# Altium PCB PCB1.PcbDoc
Units mm, origin at the board's own origin, x right, y up, seen from the top; angles counter-clockwise.
Board outline 80.26 x 80.5 mm, 2 copper layers (Top, Bottom); 35 components, 37 nets, 161 pads, 48 vias.
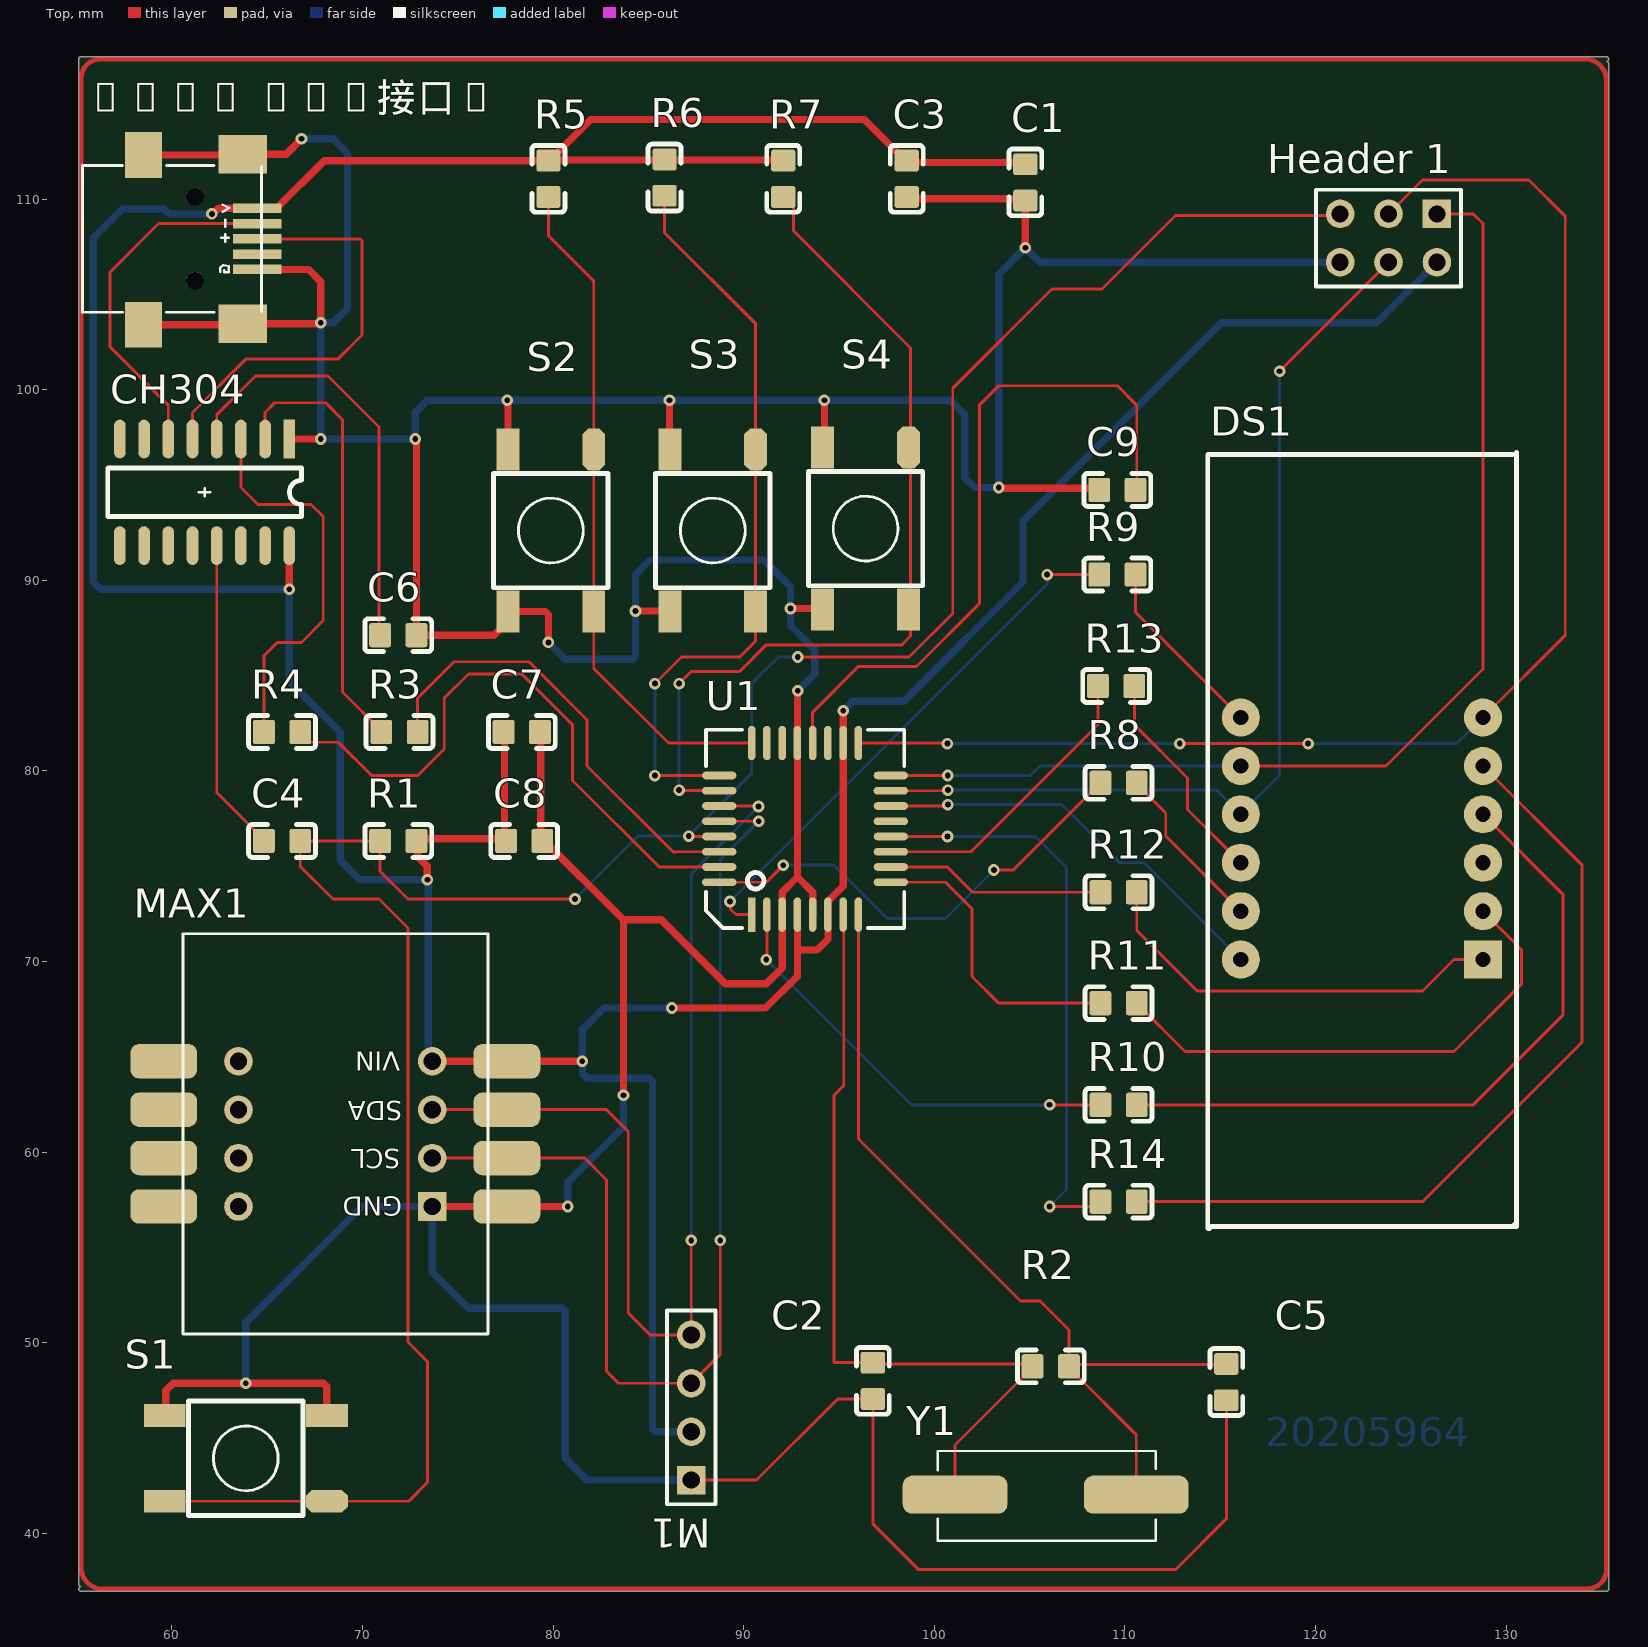
[diagram p0: Top view]
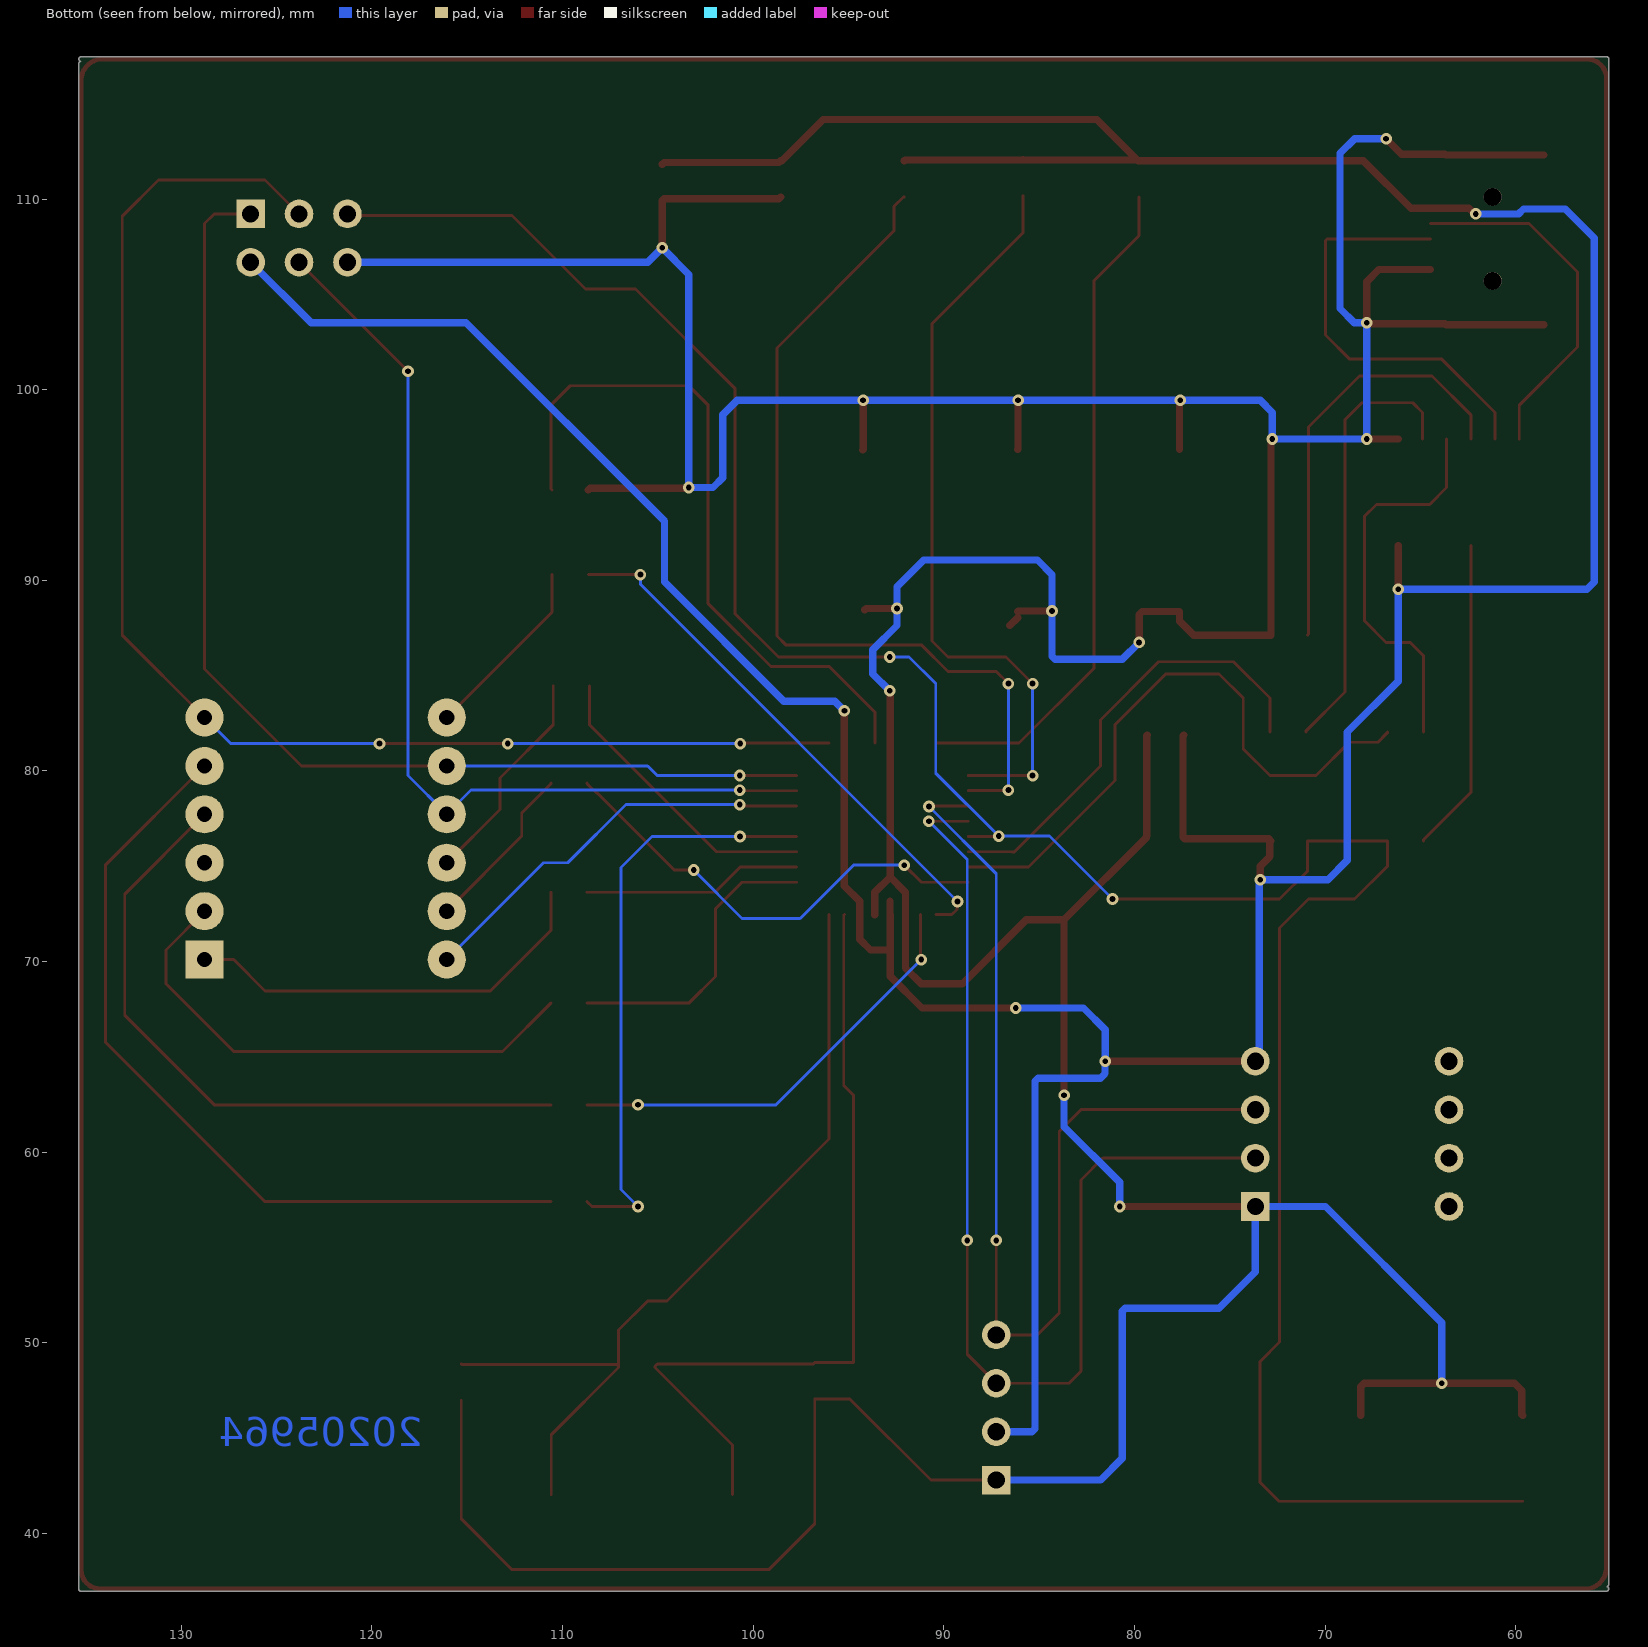
[diagram p1: Bottom view, seen from below]
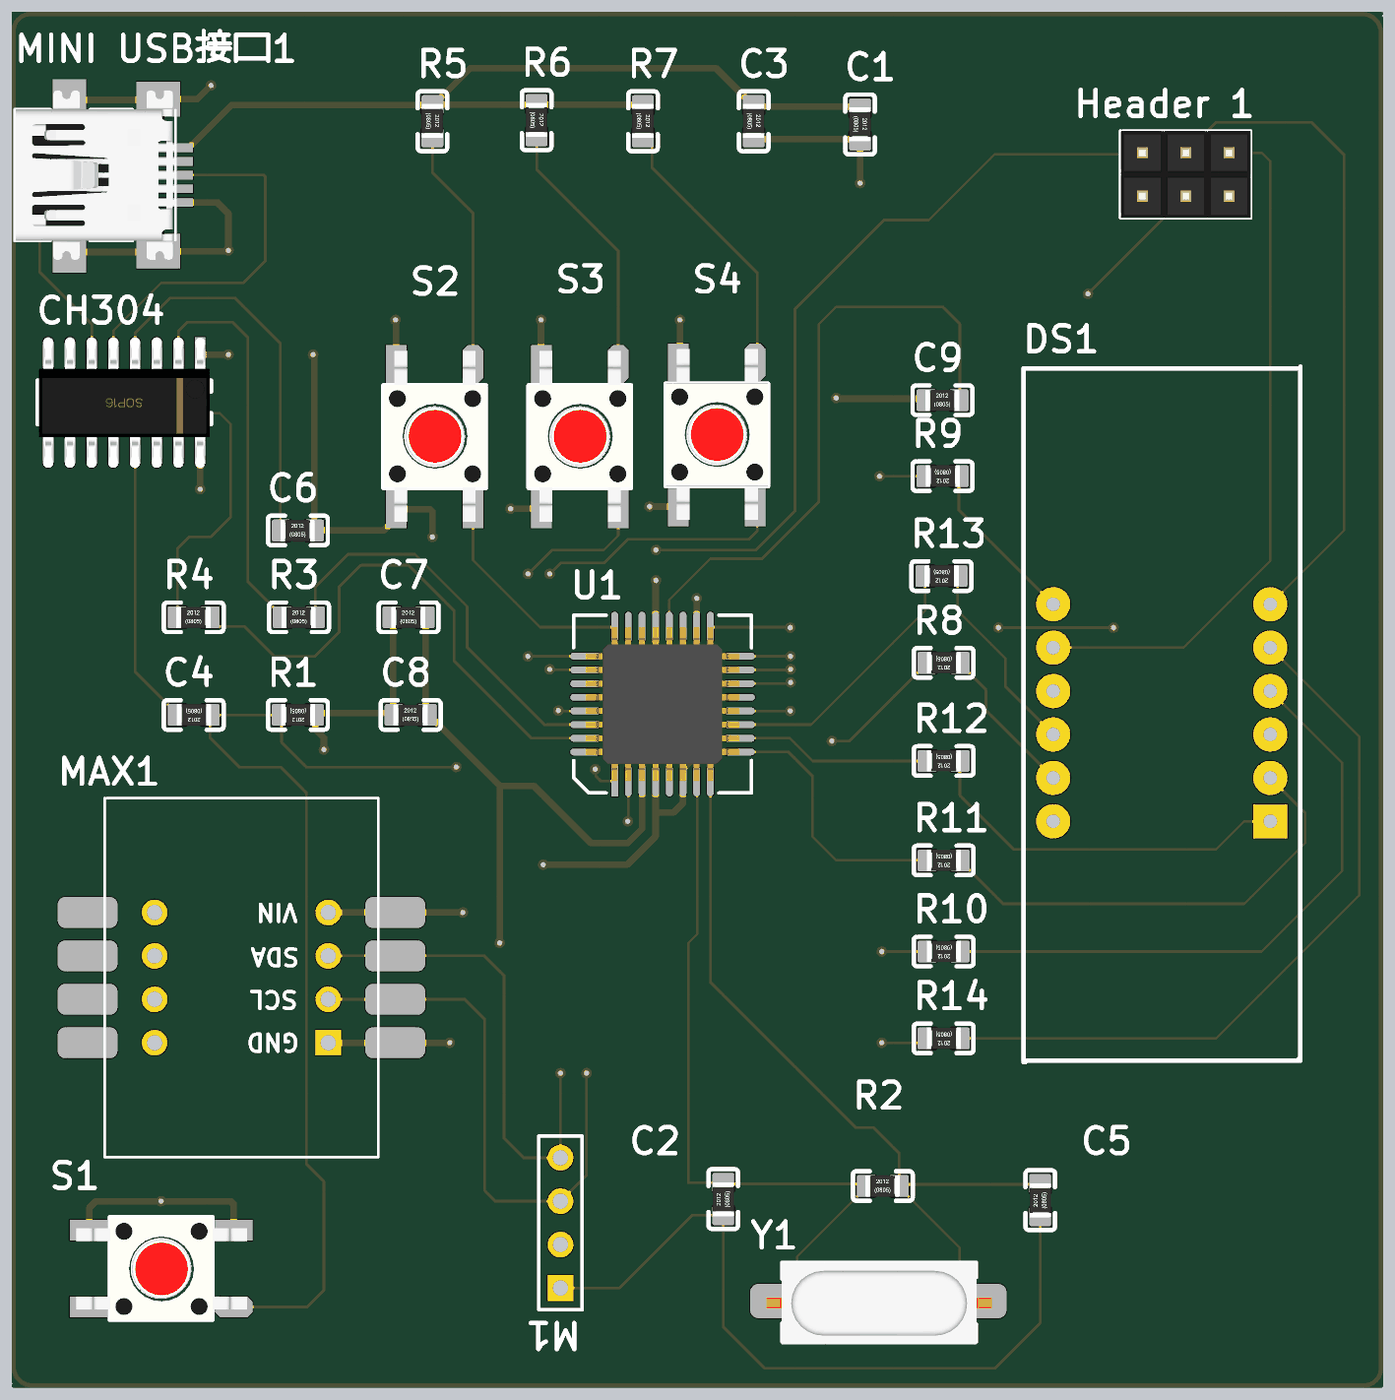
[diagram p2: 3D render of the assembled board from above, using the file's embedded part models]

## Layer stack, top to bottom
Top Solder: solder mask 0.0102, Solder Resist, Dk 3.5
Top: signal copper 0.0356
Dielectric 1: dielectric 0.32, FR-4, Dk 4.8
Bottom: signal copper 0.0356
Bottom Solder: solder mask 0.0102, Solder Resist, Dk 3.5

## Board outline
55.118,37.338 ccw(c55.245,37.338) 55.214,37.215 ccw(c55.255,37.094) 55.255,36.967 135.255,36.967 ccw(c135.255,37.094) 135.382,37.094 135.382,117.094 ccw(c135.255,117.094) 135.286,117.217 ccw(c135.245,117.338) 135.372,117.338 ccw(c135.245,117.338) 135.245,117.465 55.245,117.465 ccw(c55.245,117.338) 55.118,117.338

## Design rules (kind name [scope] priority, off if disabled: settings)
Clearance [All] p1: gap=0.152 ignorepadtopadclearanceinfootprint=FALSE
PolygonConnect [All] p1: thpad.connectstyle=Relief thpad.reliefconductorwidth=0.508 thpad.reliefentries=4 thpad.polygonreliefangle="90 Angle" thpad.airgapwidth=0.254 smdpad.connectstyle=Relief smdpad.reliefconductorwidth=0.508 smdpad.reliefentries=4 smdpad.polygonreliefangle="90 Angle" smdpad.airgapwidth=0.254 via.connectstyle=Direct via.reliefconductorwidth=0.254 via.reliefentries=4 via.polygonreliefangle="90 Angle" via.airgapwidth=0.254
RoutingVias [All] p1: holewidth=0.305 width=0.61 viastyle="Through Hole" minholewidth=0.305 minwidth=0.61 maxholewidth=0.305 maxwidth=0.61
SilkToSilkClearance [All] p1: silktosilkclearance=0.051
SilkToSolderMaskClearance [IsPad] p1: minsilkscreentomaskgap=0.051 clearancetoexposedcopper=TRUE
SolderMaskExpansion [All] p1: expansion=0.064 istentingtop=FALSE
Width Width_1 [InNetClass('PWR')] p1: maxlimit=0.508 minlimit=0.254 preferedwidth=0.381
Width [All] p2: maxlimit=0.152 minlimit=0.152 preferedwidth=0.152
28 further rules are at their usual default settings.

## Components (designator, comment, footprint, x,y, rotation, side; value= is the part's Value field where it differs from the comment)
C1 "10uF" R0805 104.775,110.871 r270 top
C2 "22pF" R0805 96.774,48.006 r90 top
C3 "0.1uF" R0805 98.552,111.061 r270 top
C4 "0.1uF" R0805 65.786,76.327 r180 top
C5 "22pF" R0805 115.316,47.942 r90 top
C6 "0.1uF" R0805 71.882,87.122 r0 top
C7 "0.1uF" R0805 78.359,82.042 r0 top
C8 "10uF" R0805 78.486,76.327 r0 top
C9 "0.1uF" R0805 109.601,94.742 r0 top
CH304 "U2" SO-16 61.722,94.615 r270 top
DS1 "4位共阴数码管" 四位数码管 122.478,76.434 r90 top
"Header 1" "P1" HDR2X3 126.365,109.22 r180 top
M1 "OLED屏" HDR1X4 87.249,42.799 r90 top
MAX1 "血氧传感器" 血氧模块 68.58,60.96 r90 top
"MINI USB接口1" "P2" USB-MINI3 64.476,107.909 r270 top
R1 "Res2" R0805 71.882,76.327 r180 top value=10K
R2 "Res2" R0805 106.108,48.768 r0 top value=1M
R3 "Res2" R0805 71.945,82.042 r0 top value=1K
R4 "Res2" R0805 65.786,82.042 r0 top value=1K
R5 "Res2" R0805 79.756,111.061 r270 top value=10K
R6 "Res2" R0805 85.852,111.125 r270 top value=10K
R7 "Res2" R0805 92.075,111.061 r270 top value=10K
R8 "Res2" R0805 109.664,79.375 r180 top value=1K
R9 "Res2" R0805 109.601,90.297 r180 top value=1K
R10 "Res2" R0805 109.664,62.484 r180 top value=1K
R11 "Res2" R0805 109.664,67.818 r180 top value=1K
R12 "Res2" R0805 109.664,73.635 r180 top value=1K
R13 "Res2" R0805 109.537,84.455 r180 top value=1K
R14 "Res2" R0805 109.664,57.404 r180 top value=1K
S1 "SW-PB" 按钮/SO 63.881,43.942 r0 top
S2 "SW-PB" 按钮/SO 79.883,92.608 r90 top
S3 "SW-PB" 按钮/SO 88.379,92.608 r90 top
S4 "SW-PB" 按钮/SO 96.393,92.71 r90 top
U1 "Atmega328P-AU" LQFP32 93.218,76.962 r90 top
Y1 "16MHz" 49SMD 110.592,42.037 r180 top

## Footprints (in the part's own frame and the unit in brackets; to place one, negate y for a bottom-side part, rotate by r counter-clockwise, add the part's x,y. Pads: shape width x height; smd on the part's side, far side on the other; paste and mask are expansions set on the pad)
49SMD [mm]
  rrect50% 5.5x2 smd: 1(0,0) 2(9.5,0)
  silkscreen extent -1.02,-2.29 10.41,2.41, body extent -1.9,-2.27 11.3,2.53, height 4.3
HDR1X4 [mm] "Connector; Header; 4 Position"
  rect 1.5x1.5 hole 0.9: 1(0,0)
  round 1.5 hole 0.9: 2(2.54,0) 3(5.08,0) 4(7.62,0)
  silkscreen extent -1.27,-1.27 8.89,1.27
HDR2X3 [mm] "Connector; Header; 3x2 Position"
  rect 1.5x1.5 hole 0.9: 1(0,0)
  round 1.5 hole 0.9: 2(0,2.54) 3(2.54,0) 4(2.54,2.54) 5(5.08,0) 6(5.08,2.54)
  silkscreen extent -1.27,-1.27 6.35,3.81, body extent -1.28,-1.27 6.34,3.81, height 8.7
LQFP32 [mm] "RS_R5F212G4"
  rect 1.8x0.4 smd: 1(-4.5,2.8)
  oval 1.8x0.4 smd: 2(-4.5,2) 3(-4.5,1.2) 4(-4.5,0.4) 5(-4.5,-0.4) 6(-4.5,-1.2) 7(-4.5,-2) 8(-4.5,-2.8) 17(4.5,-2.8) 18(4.5,-2) 19(4.5,-1.2) 20(4.5,-0.4) 21(4.5,0.4) 22(4.5,1.2) 23(4.5,2) 24(4.5,2.8)
  oval 0.4x1.8 smd: 9(-2.8,-4.502) 10(-2,-4.502) 11(-1.2,-4.502) 12(-0.4,-4.502) 13(0.4,-4.502) 14(1.2,-4.502) 15(2,-4.502) 16(2.8,-4.502) 25(2.8,4.498) 26(2,4.498) 27(1.2,4.498) 28(0.4,4.498) 29(-0.4,4.498) 30(-1.2,4.498) 31(-2,4.498) 32(-2.8,4.498)
  silkscreen extent -5.2,-5.2 5.2,5.2, body extent -4.5,-4.5 4.5,4.5, height 1.6
R0805 [mil]
  rrect20% 45x50 smd: 1(37.5,0) 2(-37.5,0)
  silkscreen extent -69,-34 69,34, body extent -40,-25 39,24, height 18
SO-16 [mil]
  rect 80x24 smd: 1(-110,175)
  oval 80x24 smd: 2(-110,125) 3(-110,75) 4(-110,25) 5(-110,-25) 6(-110,-75) 7(-110,-125) 8(-110,-175) 9(110,-175) 10(110,-125) 11(110,-75) 12(110,-25) 13(110,25) 14(110,75) 15(110,125) 16(110,175)
  silkscreen extent -50,-200 50,200, body extent -149,-197 151,197, height 66
USB-MINI3 [mil] "SMD"
  rect 20x100 smd: 1(-62.99,0) 2(-31.5,0) 3(0,0) 4(31.5,0) 5(62.99,0)
  rect 80x100 smd: 6(-175,-30) 6(175,-30)
  rect 94.49x76.77 smd: 6(-173.23,-234.72) 6(177.17,-234.72)
  round 37 hole 37 unplated: 10(86.61,-128.43) 11(-86.61,-128.43)
  silkscreen extent -152,-361 152,9, body extent -195,-358 195,12, height 154
四位数码管 [mm]
  rect 2x2 hole 0.8: 1(-6.33,-6.3)
  round 2 hole 0.8: 2(-3.79,-6.3) 3(-1.25,-6.3) 4(1.29,-6.3) 5(3.83,-6.3) 6(6.37,-6.3) 7(6.37,6.4) 8(3.83,6.4) 9(1.29,6.4) 10(-1.25,6.4) 11(-3.79,6.4) 12(-6.33,6.4)
  silkscreen extent -20.43,-8.06 20.27,8.14
按钮/SO [mm]
  rect 2.2x1.2 smd: 1(-4.25,2.25) 1(4.25,2.25) 2(-4.25,-2.25)
  oct 2.2x1.2 smd: 2(4.25,-2.25)
  silkscreen extent -3,-3 3,3, body extent -4.97,-3.03 5.03,2.97, height 4.44
血氧模块 [mm]
  rect 1.5x1.5 hole 0.9: 1(-3.81,-5.08)
  rrect50% 1.8x3.5 smd: 1(-3.81,-9) 2(-1.27,-9) 3(1.27,-9) 4(3.81,-9) 5(3.81,9) 6(1.27,9) 7(-1.27,9) 8(-3.81,9)
  round 1.5 hole 0.9: 2(-1.27,-5.08) 3(1.27,-5.08) 4(3.81,-5.08) 5(3.81,5.08) 6(1.27,5.08) 7(-1.27,5.08) 8(-3.81,5.08)
  silkscreen extent -10.5,-8 10.5,8

## Part data
C1 C2 C3 C4 C5 C6 C7 C8 C9: library part Cap, "Capacitor", LatestRevisionDate=17-Jul-2002, LatestRevisionNote="Re-released for DXP Platform.", PackageDescription="Radial Cap, Thru-Hole; 2 Leads; 0.3 in Pin Spacing", PackageReference=RAD-0.3, Published=8-Jun-2000, Publisher="Altium Limited"
CH304: library part CH340C
DS1: library part DS1
"Header 1": library part "Header 3X2"
M1: library part M1
MAX1: library part MAX30102
"MINI USB接口1": library part Header6, "Header6"
R1 R2 R3 R4 R5 R6 R7 R8 R9 R10 R11 R12 R13 R14: "Resistor", LatestRevisionDate=17-Jul-2002, LatestRevisionNote="Re-released for DXP Platform.", PackageDescription="Axial Device, Thru-Hole; 2 Leads; 0.4 in Pin Spacing", PackageReference=AXIAL-0.4, Published=8-Jun-2000, Publisher="Altium Limited"
S1 S2 S3 S4: "Switch", LatestRevisionDate=17-Jul-2002, LatestRevisionNote="Re-released for DXP Platform.", PackageDescription="Switch; 2 Leads", PackageReference=SPST-2, Published=24-Mar-1999, Publisher="Altium Limited"
Y1: library part XTAL, "Crystal Oscillator", LatestRevisionDate=17-Jul-2002, LatestRevisionNote="Re-released for DXP Platform.", PackageDescription="Crystal, Thru-Hole; 2 Leads; Body 3.1 x 8.2 mm (Dia.xH)", PackageReference=R38, Published=8-Jun-2000, Publisher="Altium Limited"

## Via types
v1: diameter 0.61, hole 0.305, Top to Bottom, tented both sides, 48 vias

## Nets (pads, with @x,y where several pads share a name; then routed paths per layer and width w, separated by ;. In a path a pad name is that pad's centre, name@x,y a point inside that pad or via, vN(x,y) a via of type N, cw(c..) or ccw(c..) an arc to the next point about the centre after c; other vN are vias at no path point)
5V: "Header 1.2" "MINI USB接口1.1" C1.2 C3.2 C7.2 C8.2 CH304.16 M1.2 MAX1.4 R1.2 R5.2 R6.2 R7.2 U1.4 U1.6 U1.18 | length 245.6
  Top w0.381: v1(62.103,109.22) 62.165,109.22 62.454,109.509 65.492,109.509 67.997,112.014 R5.2 79.819,112.014 R5.2@79.851,112.046 ; v1(66.167,89.535) CH304.16 ; v1(73.406,74.295) 73.406,74.998 72.899,75.505 72.899,76.262 R1.2 72.949,76.441 77.368,76.441 77.451,76.524 77.451,81.858 C7.2@77.419,81.89 ; MAX1.4@73.66,64.77 77.58,64.77 v1(81.534,64.77) ; v1(86.233,67.564) 91.148,67.564 92.818,69.234 92.818,70.612 ; R7.2 92.043,112.046 85.884,112.046 R6.2 85.82,112.046 R5.2@79.851,112.046 ; U1.4@92.824,73.168 92.824,72.468 U1.4 92.818,70.612 ; U1.6@94.418,73.167 U1.6@94.418,73.162 ; v1(95.218,83.153) U1.18 95.218,73.962 U1.6@94.418,73.162 ; C1.2 104.68,111.919 98.647,111.919 C3.2 98.489,112.014 96.329,114.173 81.978,114.173 R5.2@79.851,112.046 ; 92.818,70.612 93.853,70.612 94.418,71.177 U1.6 U1.6@94.418,73.162
  Bottom w0.381: v1(62.103,109.22) 59.85,109.22 59.596,109.474 57.404,109.474 55.88,107.95 55.88,89.916 56.261,89.535 v1(66.167,89.535) 66.167,84.709 68.834,82.042 68.834,75.311 69.85,74.295 v1(73.406,74.295) 73.45,74.251 73.45,64.98 MAX1.4@73.66,64.77 ; v1(86.233,67.564) 82.677,67.564 81.534,66.421 v1(81.534,64.77) 81.547,64.757 81.547,64.122 81.788,63.881 85.061,63.881 85.217,63.725 85.217,45.495 85.373,45.339 M1.2 ; v1(95.218,83.153) 95.726,83.661 98.393,83.661 104.648,89.916 104.648,93.091 115.062,103.505 123.19,103.505 126.365,106.68
A: R8.1 U1.32 | length 24.5
  Top w0.152: U1.32 91.18,74.162 v1(92.075,75.057) ; v1(103.124,74.803) 104.14,74.803 108.177,78.84 108.22,78.84 108.712,79.332 R8.1
  Bottom w0.152: v1(92.075,75.057) 94.742,75.057 97.536,72.263 100.584,72.263 v1(103.124,74.803)
B: R9.1 U1.1 | length 28.4
  Top w0.152: v1(89.281,73.152) 89.315,73.118 89.315,72.737 89.59,72.462 U1.1 ; v1(105.918,90.297) R9.1
  Bottom w0.152: v1(89.281,73.152) 105.918,89.789 v1(105.918,90.297)
C: R10.1 U1.2 | length 23.1
  Top w0.152: v1(91.186,70.104) 91.218,70.136 U1.2 ; v1(106.045,62.484) R10.1
  Bottom w0.152: v1(91.186,70.104) 98.806,62.484 v1(106.045,62.484)
D: R11.1 U1.9 | length 15.7
  Top w0.152: U1.9 100.59,74.162 101.981,72.771 101.981,69.215 103.378,67.818 R11.1
DIG1: DS1.12 U1.14 | length 21.8
  Top w0.152: U1.14 100.641,78.162 v1(100.711,78.232)
  Bottom w0.152: v1(100.711,78.232) 106.68,78.232 109.728,75.184 110.998,75.184 DS1.12
DIG2: "Header 1.4" DS1.9 U1.15 | length 51.1
  Top w0.152: U1.15 100.679,78.962 v1(100.711,78.994) ; v1(118.11,100.965) 123.825,106.68
  Bottom w0.152: v1(100.711,78.994) 114.808,78.994 DS1.9 118.11,79.756 v1(118.11,100.965)
DIG3: "Header 1.1" DS1.8 U1.16 | length 59.4
  Top w0.152: U1.16@97.726,79.756 U1.16 v1(100.705,79.762) v1@100.711,79.756 ; DS1.8 123.698,80.264 128.778,85.344 128.778,108.712 128.27,109.22 126.365,109.22
  Bottom w0.152: v1(100.705,79.762) 105.035,79.762 105.537,80.264 DS1.8
DIG4: "Header 1.3" DS1.6 U1.17 | length 72.4
  Top w0.152: U1.17 100.656,81.462 v1(100.683,81.435) v1@100.711,81.407 ; v1(112.875,81.435) v1(119.606,81.435) v1@119.634,81.407 ; 123.825,109.22 125.603,110.998 131.191,110.998 133.096,109.093 133.096,87.122 DS1.6
  Bottom w0.152: v1(100.683,81.435) v1(112.875,81.435) v1@112.975,81.534 ; v1(119.606,81.435) 127.409,81.435 DS1.6
E: R12.1 U1.10 | length 11.5
  Top w0.152: U1.10 100.679,74.962 102.006,73.635 R12.1
F: R13.1 U1.11 | length 15.7
  Top w0.152: U1.11 101.924,75.762 108.585,82.423 R13.1
G: R14.1 U1.12 | length 30.8
  Top w0.152: U1.12 v1(100.692,76.562) v1@100.711,76.581 ; v1(106.045,57.15) 108.458,57.15 R14.1
  Bottom w0.152: v1(100.692,76.562) 105.302,76.562 106.934,74.93 106.934,58.039 v1(106.045,57.15)
GND: "Header 1.6" "MINI USB接口1.5" "MINI USB接口1.6" C1.1 C2.2 C3.1 C5.2 C6.1 C7.1 C8.1 C9.2 CH304.1 M1.1 MAX1.1 S1.1 S2.1 S3.1 S4.1 U1.3 U1.5 U1.21 | length 345.1
  Top w0.152: M1.1 90.678,42.799 94.932,47.053 C2.2 96.774,40.513 99.187,38.1 112.649,38.1 115.316,40.767 C5.2
  Top w0.381: 58.514,103.409 63.659,103.409 63.714,103.464 67.777,103.464 v1(67.818,103.505) 67.818,105.664 67.173,106.309 64.476,106.309 ; 58.514,112.309 63.669,112.309 63.714,112.354 65.999,112.354 v1(66.802,113.157) ; S1.1@59.631,46.192 59.69,46.251 59.69,47.498 60.071,47.879 v1(63.881,47.879) 67.945,47.879 68.131,47.693 S1.1@68.131,46.192 ; CH304.1 v1(67.818,97.409) ; v1(72.771,97.409) 72.834,97.346 C6.1 76.897,87.122 77.633,87.858 S2.1@77.633,88.256 ; MAX1.1@73.66,57.15 77.58,57.15 v1(80.772,57.15) ; v1(77.597,99.441) 77.633,99.405 S2.1@77.633,96.858 ; S2.1@77.633,88.358 79.6,88.358 79.756,88.202 v1(79.756,86.741) ; C7.1@79.324,81.89 79.356,81.858 79.356,76.587 79.388,76.556 79.388,76.492 83.693,72.187 ; v1(83.693,62.992) 83.693,72.187 ; v1(84.328,88.392) 86.095,88.392 S3.1@86.129,88.358 ; v1(86.106,99.441) 86.106,96.881 S3.1@86.129,96.858 ; S3.1@86.129,88.04 S3.1@86.539,87.63 ; v1(92.456,88.519) 94.084,88.519 S4.1@94.143,88.46 ; v1(92.837,84.201) 92.818,84.182 U1.21 92.818,74.441 ; U1.5 93.618,73.641 92.818,74.441 ; v1(94.234,99.441) 94.234,96.856 S4.1@94.257,96.833 ; C3.1 98.647,110.014 104.68,110.014 C1.1 v1(104.775,107.442) ; v1(103.378,94.869) 103.422,94.825 108.565,94.825 C9.2 ; 83.693,72.187 85.674,72.187 89.027,68.834 91.186,68.834 92.018,69.666 U1.3 92.018,73.641 92.818,74.441
  Bottom w0.381: v1(63.881,47.879) 63.881,51.054 69.977,57.15 73.66,57.15 73.66,53.721 75.565,51.816 80.489,51.816 80.645,51.66 80.645,43.942 81.788,42.799 M1.1 ; v1(66.802,113.157) 68.453,113.157 69.215,112.395 69.215,104.254 68.466,103.505 v1(67.818,103.505) v1(67.818,97.409) v1(72.771,97.409) 72.771,98.806 73.406,99.441 v1(77.597,99.441) v1(86.106,99.441) v1(94.234,99.441) 100.838,99.441 101.6,98.679 101.6,95.377 102.108,94.869 v1(103.378,94.869) 103.378,106.045 v1(104.775,107.442) 105.537,106.68 121.285,106.68 ; v1(79.756,86.741) 80.645,85.852 84.172,85.852 84.328,86.008 v1(84.328,88.392) 84.328,90.297 85.09,91.059 91.059,91.059 92.456,89.662 v1(92.456,88.519) 92.456,87.63 93.726,86.36 93.726,85.09 v1(92.837,84.201) ; v1(80.772,57.15) 80.772,58.42 83.693,61.341 v1(83.693,62.992)
NetC2_1: C2.1 R2.2 U1.7 Y1.2 | length 42.7
  Top w0.152: U1.7 95.25,72.43 95.25,63.5 94.729,62.979 94.729,48.959 C2.1 96.837,48.895 105.029,48.895 R2.2 105.156,48.704 101.092,44.64 Y1.2
NetC4_1: C4.1 CH304.13 | length 16.5
  Top w0.152: CH304.13 62.357,78.867 64.834,76.391 C4.1
NetC5_1: C5.1 R2.1 U1.8 Y1.1 | length 45.4
  Top w0.152: U1.8 96.018,60.7 104.521,52.197 105.537,52.197 107.061,50.673 R2.1 ; Y1.1 110.592,45.174 107.061,48.704 R2.1 ; C5.1 115.284,48.863 107.156,48.863 R2.1
NetC6_2: C6.2 CH304.4 | length 22.7
  Top w0.152: CH304.4 62.357,98.679 64.389,100.711 68.199,100.711 70.866,98.044 70.866,87.185 C6.2
NetC9_1: C9.1 U1.20 | length 36.7
  Top w0.152: U1.20 93.618,83.077 96.012,85.471 99.06,85.471 102.362,88.773 102.362,99.187 103.378,100.203 109.601,100.203 110.617,99.187 110.617,94.805 C9.1
NetCH304_2: CH304.2 R3.2 | length 23.3
  Top w0.152: CH304.2 64.897,98.806 65.405,99.314 68.072,99.314 68.961,98.425 68.961,84.138 70.993,82.105 R3.2
NetCH304_3: CH304.3 R4.2 | length 20.8
  Top w0.152: CH304.3 63.627,94.869 64.516,93.98 67.31,93.98 67.945,93.345 67.945,87.884 66.802,86.741 65.532,86.741 64.834,86.042 R4.2
NetCH304_5: "MINI USB接口1.3" CH304.5 | length 22.5
  Top w0.152: CH304.5 61.087,98.806 63.881,101.6 68.707,101.6 69.977,102.87 69.977,107.82 69.888,107.909 64.476,107.909
NetCH304_6: "MINI USB接口1.2" CH304.6 | length 18.8
  Top w0.152: CH304.6 59.817,99.187 56.769,102.235 56.769,106.172 59.306,108.709 64.476,108.709
NetDS1_1: DS1.1 R12.2 | length 22.2
  Top w0.152: R12.2 110.617,71.628 113.792,68.453 125.603,68.453 127.254,70.104 DS1.1
NetDS1_2: DS1.2 R11.2 | length 27.4
  Top w0.152: R11.2 113.157,65.278 127.254,65.278 130.81,68.834 130.81,70.612 DS1.2
NetDS1_4: DS1.4 R10.2 | length 36.6
  Top w0.152: R10.2 128.27,62.484 132.969,67.183 132.969,73.533 DS1.4
NetDS1_5: DS1.5 R14.2 | length 43.5
  Top w0.152: R14.2 125.603,57.404 133.985,65.786 133.985,75.057 DS1.5
NetDS1_7: DS1.7 R9.2 | length 9.8
  Top w0.152: R9.2 110.553,88.328 DS1.7
NetDS1_10: DS1.10 R13.2 | length 11.6
  Top w0.152: R13.2 110.49,82.423 113.284,79.629 113.284,77.978 DS1.10
NetDS1_11: DS1.11 R8.2 | length 9
  Top w0.152: R8.2 110.617,79.311 112.141,77.787 112.141,76.581 DS1.11
NetR3_1: R3.1 U1.30 | length 23.9
  Top w0.152: R3.1 72.898,83.82 74.803,85.725 78.74,85.725 81.788,82.677 81.788,80.264 86.297,75.755 86.423,75.755 86.43,75.762 U1.30
NetR4_1: R4.1 U1.31 | length 32.6
  Top w0.152: R4.1 66.739,81.999 67.231,81.507 68.734,81.507 70.485,79.756 72.898,79.756 74.295,81.153 74.295,83.82 75.565,85.09 78.359,85.09 81.026,82.423 81.026,79.502 85.566,74.962 U1.31
NetR5_1: R5.1 S2.2 U1.24 | length 35.6
  Top w0.152: R5.1 79.756,108.077 82.133,105.7 82.133,96.858 82.133,88.358 82.133,85.38 86.051,81.462 U1.24
NetR6_1: R6.1 S3.2 U1.25 | length 39.7
  Top w0.152: v1(85.344,79.756) 85.35,79.762 U1.25 ; v1(85.344,84.582) 86.741,85.979 89.789,85.979 90.629,86.819 90.629,88.358 90.629,96.858 90.629,103.456 85.852,108.233 R6.1
  Bottom w0.152: v1(85.344,79.756) v1(85.344,84.582)
NetR7_1: R7.1 S4.2 U1.26 | length 46.7
  Top w0.152: v1(86.614,78.994) 86.63,78.978 88.704,78.978 U1.26 ; v1(86.614,84.582) 87.249,85.217 89.789,85.217 91.186,86.614 98.298,86.614 98.757,87.073 98.757,88.333 98.757,96.833 98.757,102.186 92.61,108.333 92.61,109.617 92.118,110.109 R7.1
  Bottom w0.152: v1(86.614,78.994) v1(86.614,84.582)
RESET: "Header 1.5" C4.2 R1.1 S1.2 U1.29 | length 135
  Top w0.152: S1.2@59.631,41.692 68.131,41.692 72.426,41.692 73.406,42.672 73.406,49.022 72.39,50.038 72.39,71.755 70.866,73.279 68.453,73.279 66.739,74.993 C4.2 R1.1 70.929,74.739 72.39,73.279 v1(81.153,73.279) ; v1(87.122,76.581) 87.141,76.562 U1.29 ; v1(92.837,85.979) 98.679,85.979 100.965,88.265 100.965,100.076 106.172,105.283 108.801,105.283 112.649,109.131 121.196,109.131 121.285,109.22
  Bottom w0.152: v1(81.153,73.279) 84.455,76.581 v1(87.122,76.581) 90.424,79.883 90.424,84.582 91.821,85.979 v1(92.837,85.979) v1@92.75,86.066
SCL: M1.3 MAX1.2 U1.28 | length 57.4
  Top w0.152: MAX1.2@73.66,59.69 77.58,59.69 81.661,59.69 82.804,58.547 82.804,48.514 83.439,47.879 M1.3 88.773,49.403 v1(88.773,55.372) ; U1.28 v1(90.786,77.362) v1@90.805,77.343
  Bottom w0.152: v1(88.773,55.372) 88.773,75.348 v1(90.786,77.362)
SDA: M1.4 MAX1.3 U1.27 | length 55.3
  Top w0.152: MAX1.3@73.66,62.23 77.58,62.23 82.804,62.23 83.947,61.087 83.947,51.562 85.09,50.419 M1.4 v1(87.249,55.372) ; U1.27 90.748,78.162 v1(90.777,78.133) v1@90.805,78.105
  Bottom w0.152: v1(87.249,55.372) 87.249,74.606 v1(90.777,78.133)
pads on no net: "MINI USB接口1.4" "MINI USB接口1.10" "MINI USB接口1.11" CH304.7 CH304.8 CH304.9 CH304.10 CH304.11 CH304.12 CH304.14 CH304.15 DS1.3 MAX1.5 MAX1.6 MAX1.7 MAX1.8 U1.13 U1.19 U1.22 U1.23
copper on no net: | length 318.7
  Top w0.254: 55.245,38.338 ccw(c56.372,38.221) 56.255,37.094 134.255,37.094 ccw(c134.255,38.094) 135.255,38.094 135.255,116.094 ccw(c134.128,116.211) 134.245,117.338 56.245,117.338 ccw(c56.245,116.338) 55.245,116.338 55.245,38.338

## Other copper
Bottom:
  text "20205964" at 117.348,44.577 h1.52

## Text inside footprints (layer, text, board x,y; h text height)
MAX1: Top Overlay "GND" at 72.08,57.66 h1 r180; Top Overlay "SCL" at 71.98,60.16 h1 r180; Top Overlay "SDA" at 72.08,62.66 h1 r180; Top Overlay "VIN" at 71.98,65.26 h1 r180